# Altium PCB CarnLog-26.PcbDoc (part 4 of 4)
Units mm, origin at the board's own origin, x right, y up, seen from the top; angles counter-clockwise.
Board outline 109.83 x 61.93 mm, 6 copper layers (Sig/Pwr/Gnd-1, Gnd-2, Sig/Pwr/Gnd-3, Sig/Pwr/Gnd-4, Gnd-5, Sig/Pwr-6), stack 1.491 mm thick; 183 components, 128 nets, 802 pads, 490 vias.
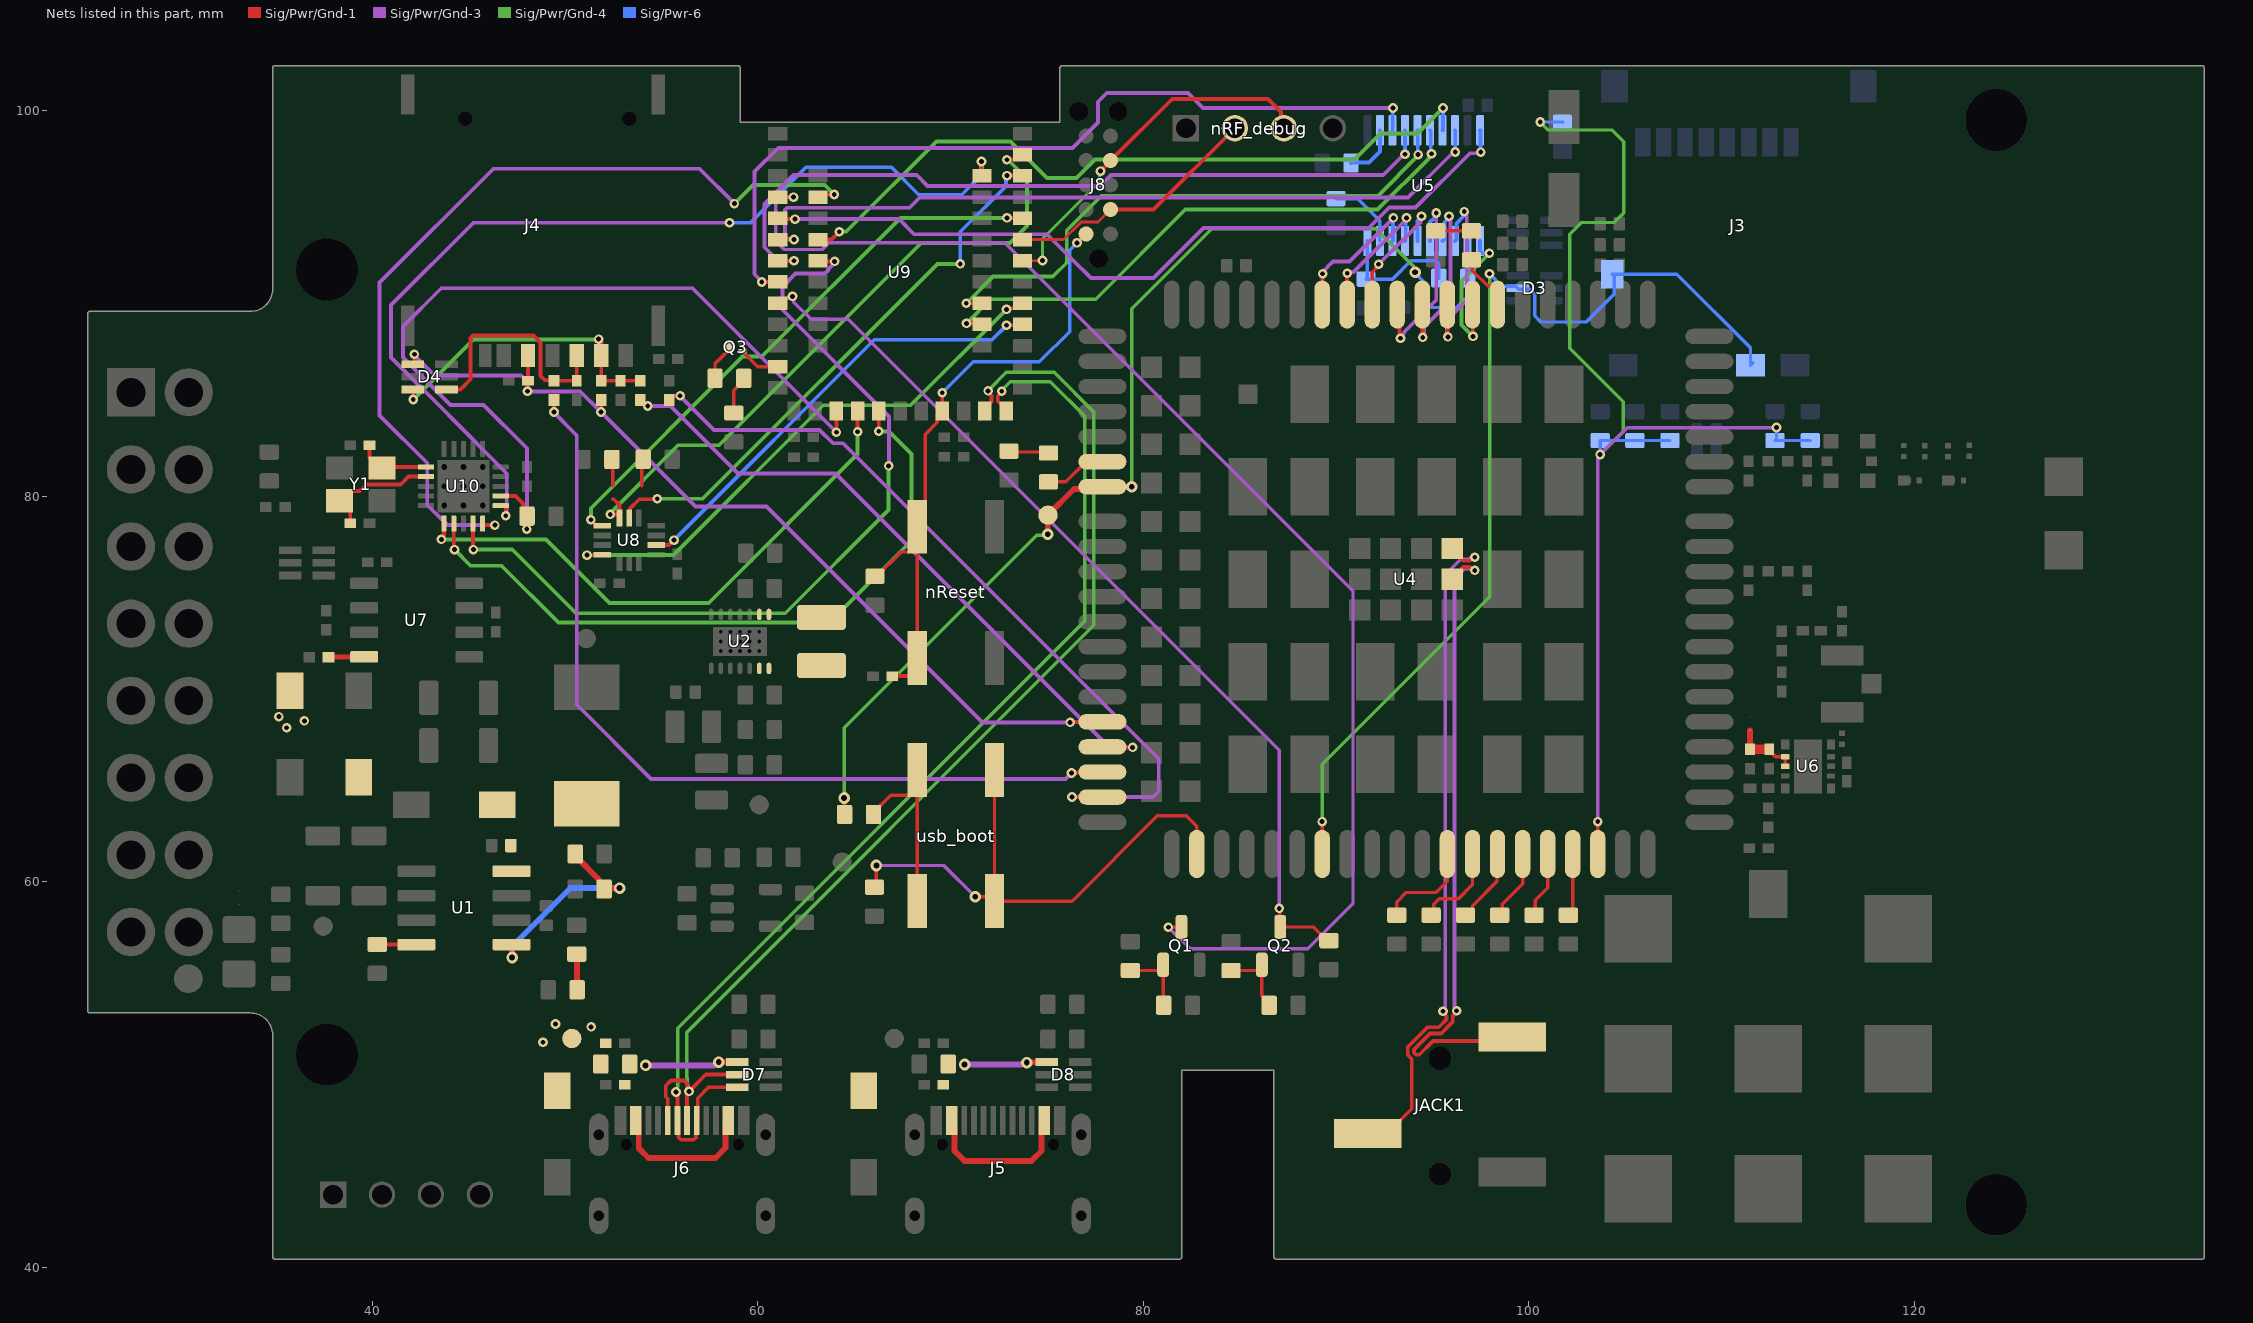
[diagram p7: the nets of this part, all layers, seen from the top]

## Via types
v1: diameter 0.5, hole 0.25, Sig/Pwr/Gnd-1 to Sig/Pwr-6, tented both sides, 370 vias
v2: diameter 0.8, hole 0.5, Sig/Pwr/Gnd-1 to Sig/Pwr-6, tented both sides, 64 vias
v3: diameter 0.6, hole 0.3, Sig/Pwr/Gnd-1 to Sig/Pwr-6, tented both sides, 46 vias
v4: diameter 0.5, hole 0.2, Sig/Pwr/Gnd-1 to Sig/Pwr-6, tented both sides, 10 vias

## Nets (pads, with @x,y where several pads share a name; then routed paths per layer and width w, separated by ;. In a path a pad name is that pad's centre, name@x,y a point inside that pad or via, vN(x,y) a via of type N, cw(c..) or ccw(c..) an arc to the next point about the centre after c; other vN are vias at no path point) (continued)
INT1: U8.4 U9.29 | length 28.8
  Sig/Pwr/Gnd-1 w0.2: v1(51.137,76.954) 51.158,76.975 U8.4@51.925,76.975 ; v1(72.9,89.7) 72.957,89.757 73.209,89.757 73.226,89.775 73.475,89.775 U9.29@73.725,90.025
  Sig/Pwr/Gnd-4 w0.2: v1(51.137,76.954) 55.62,76.954 63.391,84.725 67.925,84.725 v1(72.9,89.7)
INT2: U8.9 U9.28 | length 23.7
  Sig/Pwr/Gnd-1 w0.2: U8.9@54.725,77.475 55.39,77.475 v1(55.646,77.73) ; v1(72.9,88.875) 73.675,88.875 U9.28@73.725,88.925
  Sig/Pwr-6 w0.2: v1(55.646,77.73) 66.041,88.125 72.15,88.125 v1(72.9,88.875)
IO: C50.2 D4.3 J4.C7 R38.1 R41.1 | length 15.7
  Sig/Pwr/Gnd-1 w0.2: D4.3@42.105,85.55 42.125,85.53 v1(42.125,85.025) ; v1(51.738,88.158) 51.885,88.01 J4.C7@51.885,87.3 51.875,87.29 R38.1@51.875,86 C50.2@52.875,86 R41.1@53.9,86
  Sig/Pwr/Gnd-4 w0.2: v1(42.125,85.025) 45.243,88.143 51.723,88.143 v1(51.738,88.158)
L1: L2.1 U2.8 U2.9
L2: L2.2 U2.6 U2.7
LOUDSPK_N: JACK1.3 U4.74 | length 34.3
  Sig/Pwr/Gnd-1 w0.194: U4.74@96.025,75.7 96.478,76.153 96.478,76.226 96.592,76.34 96.933,76.34 97.112,76.16 v1(97.195,76.16) ; v1(96.252,53.31) 96.252,53.227 96.046,53.02 96.046,52.724 95.457,52.135 94.868,52.135 94.037,51.304 94.037,51.143 94.151,51.03 94.311,51.03 95.028,51.747 98.947,51.747 JACK1.3@99.15,51.95
  Sig/Pwr/Gnd-3 w0.185: v1(96.252,53.31) 96.252,53.395 96.142,53.505 96.142,75.732 96.667,76.257 96.929,76.257 96.966,76.22 97.135,76.22 v1(97.195,76.16)
LOUDSPK_P: JACK1.2 U4.73 | length 35.4
  Sig/Pwr/Gnd-1 w0.194: JACK1.2@91.65,46.95 92.65,46.95 93.924,48.224 93.924,50.803 93.716,51.01 93.716,51.437 94.735,52.455 95.324,52.455 95.725,52.856 95.725,53.022 95.546,53.201 v1(95.546,53.284) ; U4.73@96.025,77.3 96.478,76.847 96.478,76.774 96.592,76.66 96.933,76.66 97.112,76.84 v1(97.195,76.84)
  Sig/Pwr/Gnd-3 w0.185: v1(95.546,53.284) 95.546,53.369 95.657,53.479 95.657,75.933 96.466,76.743 96.929,76.743 96.966,76.78 97.135,76.78 v1(97.195,76.84)
MAIN_CTS: U4.64 U5.4 | length 10
  Sig/Pwr/Gnd-1 w0.2: U4.64@94.475,89.95 94.487,89.938 94.487,88.262 v1(94.5,88.25)
  Sig/Pwr/Gnd-3 w0.2: v1(94.5,88.25) 94.557,88.307 94.557,88.782 95.937,90.162 95.937,94.266 95.917,94.286 95.917,94.476 v1(95.859,94.533)
  Sig/Pwr-6 w0.2: U5.4@95.525,93.255 95.63,93.36 95.63,94.223 95.859,94.452 v1(95.859,94.533)
MAIN_DCD: U4.63 U5.3 | length 10.4
  Sig/Pwr/Gnd-1 w0.2: U4.63@95.775,89.95 95.787,89.938 95.787,88.287 v1(95.8,88.275)
  Sig/Pwr/Gnd-3 w0.2: v1(95.8,88.275) 95.758,88.317 95.758,89.154 96.778,90.174 96.778,94.566 96.65,94.694 v1(96.65,94.775)
  Sig/Pwr-6 w0.2: U5.3@96.175,93.255 96.249,93.329 96.249,94.165 96.593,94.509 96.593,94.711 v1@96.65,94.769
MAIN_DTR: U4.66 U5.6 | length 7
  Sig/Pwr/Gnd-1 w0.2: U4.66@91.875,89.95 91.875,91.63 92.204,91.959 v1(92.204,92.04)
  Sig/Pwr/Gnd-3 w0.2: v1(92.204,92.04) 94.376,94.212 94.376,94.477 v1(94.434,94.535)
  Sig/Pwr-6 w0.2: U5.6@94.225,93.255 94.225,94.279 94.434,94.488 v1(94.434,94.535)
MAIN_RI: U4.62 U5.1 | length 7.9
  Sig/Pwr/Gnd-1 w0.2: U4.62@97.075,89.95 97.087,89.938 97.087,88.313 v1(97.1,88.3)
  Sig/Pwr/Gnd-4 w0.2: v1(97.1,88.3) 96.5,88.9 96.5,91.16 v1(97.954,92.614)
  Sig/Pwr-6 w0.2: U5.1@97.475,93.255 97.475,92.723 97.58,92.618 97.95,92.618 v1(97.954,92.614)
MAIN_RTS: U4.65 U5.5 | length 10.7
  Sig/Pwr/Gnd-1 w0.2: U4.65@93.175,89.95 93.281,89.844 93.281,88.259 v1(93.339,88.202)
  Sig/Pwr/Gnd-3 w0.2: v1(93.339,88.202) 93.339,88.274 93.534,88.469 93.534,88.534 95.2,90.2 v1(95.2,94.7)
  Sig/Pwr-6 w0.2: U5.5@94.875,93.255 94.875,94.226 95.143,94.494 95.143,94.643 v1(95.2,94.7)
MAIN_RXD: U4.68 U5.8 | length 7.8
  Sig/Pwr/Gnd-1 w0.2: U4.68@89.275,89.95 89.287,89.962 89.287,91.538 v1(89.3,91.55)
  Sig/Pwr/Gnd-3 w0.2: v1(89.3,91.55) 89.3,91.631 89.568,91.899 89.568,91.918 89.83,92.18 90.705,92.18 v1(92.974,94.45)
  Sig/Pwr-6 w0.2: U5.8@92.925,93.255 92.95,93.28 92.95,94.425 v1(92.974,94.45)
MAIN_TXD: U4.67 U5.7 | length 7.2
  Sig/Pwr/Gnd-1 w0.2: U4.67@90.575,89.95 v1(90.575,91.575)
  Sig/Pwr/Gnd-3 w0.2: v1(90.575,91.575) 90.632,91.632 90.907,91.632 93.654,94.38 v1(93.654,94.45)
  Sig/Pwr-6 w0.2: U5.7@93.575,93.255 93.615,93.295 93.615,94.41 v1(93.654,94.45)
MCP_CS: U9.47 U10.16 | length 50.3
  Sig/Pwr/Gnd-1 w0.2: U10.16@46.66,79.525 46.89,79.525 46.92,79.495 v1(46.92,78.995) ; v1(71.6,97.375) 71.6,96.65 U9.47@71.625,96.625
  Sig/Pwr/Gnd-3 w0.2: v1(46.92,78.995) 46.975,79.05 46.975,81.196 43.975,84.196 43.975,84.212 40.975,87.212 40.975,89.925 45.246,94.196 v1(58.527,94.196)
  Sig/Pwr-6 w0.2: v1(58.527,94.196) 59.621,94.196 62.5,97.075 66.925,97.075 68.35,95.65 70.575,95.65 71.6,96.675 v1(71.6,97.375)
MCP_INT: U9.17 U10.11 | length 29.3
  Sig/Pwr/Gnd-1 w0.2: v1(43.58,77.77) 43.601,77.79 43.725,77.79 U10.11@43.725,78.59 ; v1(65.175,83.35) U9.17@65.175,84.425
  Sig/Pwr/Gnd-4 w0.2: v1(43.58,77.77) 49.005,77.77 52.3,74.475 57.45,74.475 65.175,82.2 v1(65.175,83.35)
MCP_MISO: U9.39 U10.15 | length 45.5
  Sig/Pwr/Gnd-1 w0.2: U10.15@45.725,78.59 45.725,78.54 45.755,78.51 v1(46.355,78.51) ; U9.39@63.125,95.525 63.263,95.663 v1(63.959,95.663)
  Sig/Pwr/Gnd-3 w0.2: v1(46.355,78.51) 43.892,78.51 42.85,79.551 42.85,81.725 40.37,84.205 40.37,91.095 46.275,97 56.971,97 v1(58.782,95.189)
  Sig/Pwr/Gnd-4 w0.2: v1(58.782,95.189) 59.743,96.15 63.473,96.15 v1(63.959,95.663)
MCP_MOSI: U9.42 U10.14 | length 44.6
  Sig/Pwr/Gnd-1 w0.2: U10.14@45.225,78.59 45.225,77.258 v1(45.243,77.24) ; U9.42@63.125,92.225 63.16,92.19 v1(63.982,92.19)
  Sig/Pwr/Gnd-3 w0.2: v1(63.982,92.19) 63.982,92.108 63.642,91.768 63.642,91.717 63.484,91.559 61.959,91.559 61.27,90.87 61.27,89.68 66.805,84.145 66.805,81.605 v1(66.782,81.582)
  Sig/Pwr/Gnd-4 w0.2: v1(45.243,77.24) 47.26,77.24 50.566,73.934 61.42,73.934 66.782,79.296 v1(66.782,81.582)
MCP_RST: R56.2 U9.16 U10.17 | length 44.4
  Sig/Pwr/Gnd-1 w0.2: U10.17@46.66,80.025 47.421,80.025 47.815,79.631 47.815,79.185 R56.2@48.025,78.975 48.008,78.958 v1(48.008,78.3) ; v1(64.075,83.325) U9.16@64.075,84.425
  Sig/Pwr/Gnd-3 w0.2: v1(48.008,78.3) 48.03,78.322 48.03,82.495 45.775,84.75 44.05,84.75 41.595,87.205 41.595,88.82 43.575,90.8 56.6,90.8 v1(64.075,83.325)
MCP_SCK: U9.18 U10.12 | length 36.1
  Sig/Pwr/Gnd-1 w0.2: U10.12@44.225,78.59 44.225,77.274 v1(44.26,77.24) ; v1(66.275,83.375) U9.18@66.275,84.425
  Sig/Pwr/Gnd-4 w0.2: v1(44.26,77.24) 45.099,76.4 46.7,76.4 49.65,73.45 63.725,73.45 67.975,77.7 67.975,82.2 66.8,83.375 v1(66.275,83.375)
MCU_CTS: U5.17 U9.41 | length 38
  Sig/Pwr/Gnd-1 w0.2: U9.41@63.125,93.325 63.825,93.325 v1(64.225,93.725)
  Sig/Pwr/Gnd-4 w0.2: v1(64.225,93.725) 64.239,93.739 64.589,93.739 69.27,98.42 73.102,98.42 74.997,96.525 76.54,96.525 77.495,97.48 90.955,97.48 92.3,98.825 94.225,98.825 v1(95.55,100.15)
  Sig/Pwr-6 w0.2: U5.17@95.525,98.995 95.537,99.007 95.537,100.137 v1(95.55,100.15)
MCU_DCD: U5.18 U9.6 | length 39.9
  Sig/Pwr/Gnd-1 w0.2: U9.6@61.025,93.325 v1(61.875,93.325)
  Sig/Pwr/Gnd-3 w0.2: v1(61.875,93.325) 61.855,93.345 61.517,93.345 61.4,93.462 61.4,94.859 61.517,94.976 67.876,94.976 68.4,95.5 93.726,95.5 95.952,97.726 95.96,97.726 96.104,97.87 v1(96.185,97.87)
  Sig/Pwr-6 w0.2: U5.18@96.175,98.995 96.18,98.99 96.18,97.875 v1(96.185,97.87)
MCU_DTR: U5.15 U9.53 | length 29.7
  Sig/Pwr/Gnd-1 w0.2: v1(70.815,90.023) 71.623,90.023 U9.53@71.625,90.025
  Sig/Pwr/Gnd-4 w0.2: v1(70.815,90.023) 72.192,91.4 75.3,91.4 76.024,92.124 76.024,93.799 77.816,95.591 92.165,95.591 94.255,97.68 v1(94.255,97.73)
  Sig/Pwr-6 w0.2: U5.15@94.225,98.995 94.24,98.98 94.24,97.745 v1(94.255,97.73)
MCU_PWR: C26.2 Q2.C U9.9 | length 48.1
  Sig/Pwr/Gnd-1 w0.177: U9.9@61.025,90.025 61.287,90.287 61.624,90.287 61.713,90.375 v1(61.8,90.375) ; v1(87.05,58.625) 87.075,58.6 87.075,57.685 Q2.C@87.1,57.66 88.815,57.66 89.525,56.95 C26.2@89.625,56.95
  Sig/Pwr/Gnd-3 w0.177: v1(61.8,90.375) 61.862,90.313 61.862,90.081 62.76,89.183 64.692,89.183 87.05,66.825 v1(87.05,58.625)
MCU_RI: U5.20 U9.5 | length 41.6
  Sig/Pwr/Gnd-1 w0.2: U9.5@61.025,94.425 61.067,94.383 v1(61.93,94.383)
  Sig/Pwr/Gnd-3 w0.2: v1(61.93,94.383) 67.32,94.383 68.104,93.6 75.004,93.6 76.018,92.586 76.328,92.276 77.279,91.325 80.525,91.325 83.12,93.92 91.695,93.92 92.755,94.98 94.129,94.98 96.953,97.803 97.444,97.803 v1(97.501,97.861)
  Sig/Pwr-6 w0.2: U5.20@97.475,98.995 97.488,98.982 97.488,97.874 v1(97.501,97.861)
MCU_RST: Q1.C U9.4 | length 69.5
  Sig/Pwr/Gnd-1 w0.177: U9.4@61.025,95.525 v1(61.85,95.525) ; v1(81.3,57.65) 81.965,57.65 Q1.C@81.975,57.66
  Sig/Pwr/Gnd-3 w0.177: v1(61.85,95.525) 61.281,95.525 60.925,95.169 60.925,93.264 61.383,92.807 63.329,92.807 63.683,93.161 72.814,93.161 90.875,75.1 90.875,58.875 88.525,56.525 82.425,56.525 v1(81.3,57.65)
MCU_RTS: U5.16 U9.54 | length 29.9
  Sig/Pwr/Gnd-1 w0.2: v1(70.823,88.976) 71.574,88.976 U9.54@71.625,88.925
  Sig/Pwr/Gnd-4 w0.2: v1(70.823,88.976) 72.076,90.23 77.53,90.23 82.175,94.875 92.149,94.875 94.785,97.511 94.785,97.529 94.95,97.694 v1(94.95,97.775)
  Sig/Pwr-6 w0.2: U5.16@94.875,98.995 94.913,98.957 94.913,97.812 v1(94.95,97.775)
MCU_RXD: U5.13 U9.8 | length 43.6
  Sig/Pwr/Gnd-1 w0.2: v1(60.2,91.125) U9.8@61.025,91.125
  Sig/Pwr/Gnd-3 w0.2: v1(60.2,91.125) 60.2,91.151 59.824,91.527 59.824,96.849 61.055,98.08 76.33,98.08 77.65,99.4 77.65,100.475 78.1,100.925 82.325,100.925 83.1,100.15 v1(92.95,100.15)
  Sig/Pwr-6 w0.2: U5.13@92.925,98.995 92.937,99.007 92.937,100.137 v1(92.95,100.15)
MCU_TXD: U5.14 U9.7 | length 40.9
  Sig/Pwr/Gnd-1 w0.2: U9.7@61.025,92.225 v1(61.875,92.225)
  Sig/Pwr/Gnd-3 w0.2: v1(61.875,92.225) 61.05,92.225 60.35,92.925 60.35,95.175 61.855,96.68 68.241,96.68 68.809,96.112 77.761,96.112 78.33,96.68 92.448,96.68 93.518,97.75 v1(93.575,97.75)
  Sig/Pwr-6 w0.2: v1(93.575,97.75) U5.14@93.575,98.995
NetC6_1: C6.1 R4.2 | length 1.9
  Sig/Pwr/Gnd-1 w0.3: C6.1@50.6,56.25 50.613,56.237 50.613,54.413 R4.2@50.625,54.4
NetN_STS1_A: N_STS1.A U4.6 | length 3.2
  Sig/Pwr/Gnd-1 w0.177: N_STS1.A@75.075,80.75 75.975,80.75 77.025,81.8 U4.6@77.875,81.8
NetN_STS1_K: N_STS1.K R20.1 | length 2.1
  Sig/Pwr/Gnd-1 w0.177: R20.1@73.025,82.35 73.075,82.3 75.025,82.3 N_STS1.K@75.075,82.25
NetnRF_LED_A: nRF_LED.A R46.1 | length 2
  Sig/Pwr/Gnd-1 w0.177: R46.1@58.75,84.325 58.75,85.494 59.275,86.019 nRF_LED.A@59.275,86.125
NetnRF_LED_K: nRF_LED.K Q3.3 | length 1.9
  Sig/Pwr/Gnd-1 w0.177: nRF_LED.K@57.775,86.125 57.775,86.89 58.373,87.488 58.388,87.488 58.5,87.6 Q3.3@58.5,87.75
NetR10_2: R10.2 usb_boot.1 usb_boot.2 | length 9.7
  Sig/Pwr/Gnd-1 w0.177: R10.2@66,63.5 66,63.6 66.888,64.488 67.863,64.488 usb_boot.2@68.275,64.9 ; usb_boot.1@68.275,59 usb_boot.2@68.275,65.8
NetR14_2: R14.2 STS1.K | length 1.8
  Sig/Pwr/Gnd-1 w0.177: R14.2@95.175,93.775 STS1.K@97.025,93.775
NetR17_1: R17.1 R19.2 U5.10 | length 7
  Sig/Pwr-6 w0.177: U5.10@91.625,93.255 91.625,91.35 R19.2@91.55,91.275 92.925,91.275 93.878,92.228 95.197,92.228 95.325,92.1 R17.1@95.325,91.325
NetR21_1: R21.1 U5.12 | length 2.8
  Sig/Pwr-6 w0.2: R21.1@90.775,97.3 90.8,97.325 91.7,97.325 92.275,97.9 U5.12@92.275,98.995
NetR22_2: R22.2 U5.9 | length 3.8
  Sig/Pwr-6 w0.177: R22.2@90,95.45 91.125,95.45 92.275,94.3 U5.9@92.275,93.255
NetSTS1_A: STS1.A U4.61 | length 3
  Sig/Pwr/Gnd-1 w0.177: STS1.A@97.025,92.275 97.064,92.236 97.064,91.713 97.859,90.919 98.087,90.919 98.375,90.631 U4.61@98.375,89.95
nRESET: C55.2 J8.10 nReset.1 nReset.2 R47.2 U9.21 | length 32.5
  Sig/Pwr/Gnd-1 w0.177: R47.2@66.075,75.85 66.175,75.85 67.438,77.113 67.863,77.113 nReset.2@68.275,77.525 ; nReset.1@68.275,71.625 nReset.2@68.275,77.525 ; v1(69.568,85.375) 69.575,85.368 U9.21@69.575,84.425 69.313,84.163 69.313,83.838 68.687,83.212 68.687,78.837 nReset.2@68.275,78.425 nReset.2@68.275,77.525 ; v1(76.554,93.152) 76.561,93.152 77.024,93.615 J8.10@77.03,93.615
  Sig/Pwr/Gnd-1 w0.2: C55.2@66.975,70.675 67.875,70.675 68.275,71.075 nReset.1@68.275,71.625
  Sig/Pwr-6 w0.177: v1(69.568,85.375) 71.168,86.975 74.6,86.975 76.175,88.55 76.175,92.773 v1(76.554,93.152)
nRF_LED: Q3.1 U9.12 | length 2.2
  Sig/Pwr/Gnd-1 w0.177: Q3.1@59.2,87.525 59.275,87.525 59.312,87.488 59.312,87.413 60,86.725 U9.12@61.025,86.725
nRF_USB_N: D7.5 J6.A7 J6.B7 U9.23 | length 60.1
  Sig/Pwr/Gnd-1 w0.194: J6.B7@55.325,47.625 55.325,48.747 55.223,48.849 55.223,49.423 55.5,49.7 56.175,49.7 56.371,49.504 56.371,49.188 v1(56.429,49.13) ; J6.A7@56.325,47.625 56.325,49.13 v1(56.429,49.13) ; D7.5@58.93,50 57.3,50 v1(56.429,49.13) ; U9.23@71.775,84.425 71.775,84.575 72.124,84.924 72.124,85.216 71.945,85.395 v1(71.945,85.475)
  Sig/Pwr/Gnd-4 w0.185: v1(56.429,49.13) 56.369,49.19 56.369,49.359 56.332,49.396 56.332,49.845 56.321,49.857 56.321,52.203 77.435,73.317 77.435,84.376 75.376,86.435 72.887,86.435 71.945,85.493 v1(71.945,85.475)
nRF_USB_P: D7.6 J6.A6 J6.B6 U9.24 | length 58.3
  Sig/Pwr/Gnd-1 w0.194: v1(55.75,49.1) 55.825,49.1 J6.A6@55.825,47.625 55.878,47.572 55.878,46.747 56,46.625 56.674,46.625 56.788,46.739 56.788,47.588 56.878,47.678 56.878,48.778 57.45,49.35 D7.6@58.93,49.35 ; v1(72.649,85.458) 72.649,85.396 72.445,85.192 72.445,84.942 72.559,84.828 72.622,84.828 72.875,84.575 U9.24@72.875,84.425
  Sig/Pwr/Gnd-4 w0.185: v1(55.75,49.1) 55.81,49.16 55.81,49.329 55.847,49.366 55.847,49.644 55.835,49.656 55.835,52.404 76.95,73.518 76.95,84.175 75.175,85.95 73.088,85.95 72.649,85.511 v1(72.649,85.458)
nRF_VUSB: C53.1 D9.K D10.A FB1.1 TP10.1
  other v1: 48.85,51.675 51.35,52.475 49.5,52.625 35.55,68 36.475,68.35 35.15,68.575
OSC1: C60.2 U10.6 Y1.1 | length 3.8
  Sig/Pwr/Gnd-1 w0.2: C60.2@39.85,82.65 39.85,82.025 40.4,81.475 Y1.1@40.5,81.475 40.55,81.525 U10.6@42.79,81.525
OSC2: C62.2 U10.7 Y1.3 | length 6.4
  Sig/Pwr/Gnd-1 w0.2: C62.2@38.85,78.6 38.85,79.275 38.35,79.775 Y1.3@38.3,79.775 38.8,80.275 39.346,80.275 39.696,80.625 41.475,80.625 41.88,81.03 42.785,81.03 U10.7@42.79,81.025
PH: C1.1 D1.K L1.1 U1.8
PK_BS: Q2.B R15.2 R16.2 | length 4
  Sig/Pwr/Gnd-1 w0.177: R15.2@84.55,55.4 85.938,55.4 86.15,55.612 Q2.B@86.15,55.7 86.15,54.081 86.525,53.706 R16.2@86.525,53.6
RST: C48.2 D4.4 J4.C2 R39.2 | length 12.5
  Sig/Pwr/Gnd-1 w0.2: D4.4@43.845,85.55 44.575,85.55 45.1,86.075 45.1,88.233 45.217,88.35 48.354,88.35 48.72,87.984 48.72,86.255 48.95,86.025 49.4,86.025 R39.2@49.425,86 C48.2@50.6,86 50.6,87.285 J4.C2@50.615,87.3
RST_BS: Q1.B R12.2 R13.2 | length 4
  Sig/Pwr/Gnd-1 w0.177: R12.2@79.325,55.4 80.813,55.4 81.025,55.612 Q1.B@81.025,55.7 81.025,53.625 R13.2@81.05,53.6
S: R48.1 U7.8 | length 1.6
  Sig/Pwr/Gnd-1 w0.25: R48.1@37.975,71.65 37.998,71.673 U7.8@39.575,71.673
SCL: SB3.2 U8.13 U9.35 | length 29.3
  Sig/Pwr/Gnd-1 w0.2: U8.13@53.325,78.875 53.375,78.925 53.375,79.379 53.846,79.85 SB3.2@53.975,79.85 54.751,79.85 v1(54.78,79.879) ; v1(72.925,96.642) 73.708,96.642 U9.35@73.725,96.625
  Sig/Pwr/Gnd-4 w0.2: v1(54.78,79.879) 57.129,79.879 69.314,92.064 v1(70.502,92.064)
  Sig/Pwr-6 w0.2: v1(70.502,92.064) 70.502,93.727 72.868,96.093 72.868,96.584 v1(72.925,96.642)
SCL_: R55.1 SB4.1 | length 1.4
  Sig/Pwr/Gnd-1 w0.2: R55.1@52.425,81.919 52.475,81.869 SB4.1@52.475,80.55
SD_CLK: R36.1 U4.32 | length 3.5
  Sig/Pwr/Gnd-1 w0.177: R36.1@100.271,58.275 100.325,58.329 100.325,59.05 100.975,59.7 U4.32@100.975,61.45
SD_CMD: R37.1 U4.33 | length 3.3
  Sig/Pwr/Gnd-1 w0.177: R37.1@102.051,58.275 102.275,58.499 U4.33@102.275,61.45
SD_DAT0: R35.1 U4.31 | length 3.7
  Sig/Pwr/Gnd-1 w0.177: R35.1@98.49,58.275 98.612,58.396 98.612,58.837 99.675,59.9 U4.31@99.675,61.45
SD_DAT1: R34.1 U4.30 | length 3.9
  Sig/Pwr/Gnd-1 w0.177: R34.1@96.71,58.275 96.768,58.275 97.078,58.586 97.078,58.77 98.348,60.04 98.348,61.423 U4.30@98.375,61.45
SD_DAT2: R33.1 U4.29 | length 4.6
  Sig/Pwr/Gnd-1 w0.177: R33.1@94.93,58.275 95.062,58.406 95.062,58.837 95.35,59.125 96.35,59.125 97.075,59.85 U4.29@97.075,61.45
SD_DAT3: R32.1 U4.28 | length 5.2
  Sig/Pwr/Gnd-1 w0.177: R32.1@93.15,58.275 93.15,58.95 93.65,59.45 95.2,59.45 95.775,60.025 U4.28@95.775,61.45
SD_DET: D3.5 J3.9 J3.10 U4.23 | length 53.4
  Sig/Pwr/Gnd-1 w0.177: U4.23@89.275,61.45 v1(89.275,63.125)
  Sig/Pwr/Gnd-4 w0.177: v1(89.275,63.125) 89.275,66.1 97.972,74.797 97.972,91.538 v1(97.962,91.549)
  Sig/Pwr-6 w0.177: v1(97.962,91.549) 97.962,91.537 98.587,90.912 99.313,90.912 D3.5@99.425,90.8 99.475,90.75 100.05,90.75 100.3,90.5 100.3,89.375 100.627,89.048 102.973,89.048 104.425,90.5 104.425,91.425 J3.9@104.325,91.525 107.675,91.525 111.5,87.7 J3.10@111.5,86.8 J3.10@111.625,86.925
SD_VDD: R26.2 R27.2 R28.2 R29.2 R30.2 R31.2 U4.34 | length 63.3
  Sig/Pwr/Gnd-1 w0.177: U4.34@103.575,61.45 v1(103.575,63.125)
  Sig/Pwr/Gnd-3 w0.177: v1(103.575,63.125) 103.575,81.963 103.7,82.088 v1(103.7,82.175) 105.095,83.57 v1(112.85,83.57)
  Sig/Pwr/Gnd-4 w0.177: v1(100.595,99.425) 101.013,99.007 104.318,99.007 104.927,98.398 104.927,94.702 104.436,94.211 102.736,94.211 102.117,93.592 102.117,87.683 104.9,84.9 104.9,83.375 v1(103.7,82.175)
  Sig/Pwr-6 w0.177: v1(100.595,99.425) 101.725,99.425 R26.2@101.75,99.4 ; v1(103.7,82.175) R27.2@103.7,82.9 R29.2@105.5,82.9 R28.2@107.325,82.9 ; v1(112.85,83.57) 112.85,82.975 R31.2@112.775,82.9 R30.2@114.6,82.9
SDA: SB4.2 U8.14 U9.36 | length 34.5
  Sig/Pwr/Gnd-1 w0.2: v1(52.346,79.064) 52.775,79.064 52.825,79.014 U8.14@52.825,78.875 52.825,79.55 52.525,79.85 SB4.2@52.475,79.85 ; v1(72.919,97.464) 72.93,97.475 73.475,97.475 U9.36@73.725,97.725
  Sig/Pwr/Gnd-4 w0.2: v1(52.346,79.064) 52.346,79.145 55.85,82.65 57.975,82.65 68.475,93.15 73.08,93.15 73.965,94.035 73.965,96.48 72.981,97.464 v1(72.919,97.464)
SDA_: R54.1 SB3.1 | length 1.4
  Sig/Pwr/Gnd-1 w0.2: SB3.1@53.975,80.55 53.975,81.85 R54.1@54.05,81.925
SDO/SAO: U8.1 U9.33 | length 30
  Sig/Pwr/Gnd-1 w0.2: v1(51.335,78.785) 51.335,78.765 51.625,78.475 U8.1@51.925,78.475 ; v1(72.925,94.45) 73.7,94.45 U9.33@73.725,94.425
  Sig/Pwr/Gnd-4 w0.2: v1(51.335,78.785) 51.335,79.385 59.2,87.25 60.2,87.25 67.4,94.45 v1(72.925,94.45)
SENSE: R2.1 R5.2 U1.5 | length 11.4
  Sig/Pwr/Gnd-1 w0.3: U1.5@47.22,56.745 47.25,56.715 v3(47.25,56.075) ; R2.1@50.525,61.45 50.525,61.35 51.775,60.1 51.775,59.875 R5.2@52.025,59.625 52.05,59.65 52.8,59.65 v3(52.825,59.675)
  Sig/Pwr-6 w0.3: v3(47.25,56.075) 47.25,56.65 50.275,59.675 v3(52.825,59.675)
SS: C8.2 U1.4 | length 2
  Sig/Pwr/Gnd-1 w0.2: C8.2@40.25,56.75 40.255,56.745 U1.4@42.28,56.745
  Sig/Pwr/Gnd-1 w0.3: U1.4@42.28,56.745 U1.4@42.28,56.75
SWDCLK: J8.4 nRF_debug.03 U9.31 | length 19.1
  Sig/Pwr/Gnd-1 w0.15: U9.31@73.725,92.225 74.757,92.225 v1(74.769,92.237)
  Sig/Pwr/Gnd-1 w0.2: v1(77.775,96.875) 77.775,96.888 78.3,97.413 J8.4@78.3,97.425 81.5,100.625 86.475,100.625 87.149,99.951 87.149,99.241 nRF_debug.03@87.29,99.1
  Sig/Pwr/Gnd-4 w0.15: v1(74.769,92.237) 74.769,93.369 77.725,96.325 77.725,96.825 v1(77.775,96.875)
SWDIO: J8.2 nRF_debug.02 U9.32 | length 13.4
  Sig/Pwr/Gnd-1 w0.15: U9.32@73.725,93.325 75.865,93.325 76.774,94.234 77.649,94.234 J8.2@78.3,94.885
  Sig/Pwr/Gnd-1 w0.2: J8.2@78.3,94.885 80.535,94.885 nRF_debug.02@84.75,99.1
USB_BOOT: R11.2 U4.115 usb_boot.3 usb_boot.4 | length 28.8
  Sig/Pwr/Gnd-1 w0.177: R11.2@66.05,59.725 66.15,59.825 v3(66.15,60.85) ; v3(71.275,59.225) 72.05,59.225 usb_boot.3@72.275,59 ; usb_boot.4@72.275,65.8 usb_boot.3@72.275,59 ; U4.115@82.775,61.45 82.775,62.875 82.226,63.424 80.724,63.424 76.3,59 usb_boot.3@72.275,59
  Sig/Pwr/Gnd-3 w0.177: v3(66.15,60.85) 69.65,60.85 v3(71.275,59.225)
USIM_CLK: R39.1 U4.16 | length 45.3
  Sig/Pwr/Gnd-1 w0.2: v1@49.424,84.378 R39.1@49.424,84.999 ; v1(76.275,65.65) 76.3,65.675 77.85,65.675 U4.16@77.875,65.7
  Sig/Pwr/Gnd-3 w0.2: v1(49.424,84.377) 49.424,84.35 50.607,83.167 50.607,69.193 54.455,65.345 75.97,65.345 v1(76.275,65.65)
USIM_DATA: R41.2 U4.15 | length 34.6
  Sig/Pwr/Gnd-1 w0.2: R41.2@53.9,85 53.9,84.975 54.126,84.749 54.225,84.749 v1(54.283,84.692) ; U4.15@77.875,67 77.888,66.988 79.433,66.988 v1(79.445,66.975)
  Sig/Pwr/Gnd-3 w0.2: v1(54.283,84.692) 55.47,84.692 58.972,81.19 64.035,81.19 78.25,66.975 v1(79.445,66.975)
USIM_RST: R40.1 U4.17 | length 41.2
  Sig/Pwr/Gnd-1 w0.2: R40.1@55.4,85 55.4,85.025 55.575,85.2 55.95,85.2 v1(55.967,85.216) ; v1(76.3,64.4) U4.17@77.875,64.4
  Sig/Pwr/Gnd-3 w0.2: v1(55.967,85.216) 57.733,83.45 63.2,83.45 63.895,82.755 64.415,82.755 80.8,66.37 80.8,64.7 80.5,64.4 v1@76.317,64.4
USIM_VDD: C49.2 D4.1 J4.C1 R38.2 U4.14 | length 47
  Sig/Pwr/Gnd-1 w0.2: D4.1@42.105,86.85 42.18,86.925 v1(42.18,87.37) ; v1(48.05,85.45) 48.05,85.975 C49.2@48.075,86 J4.C1@48.075,87.3 ; v1(51.859,84.376) 51.875,84.392 R38.2@51.875,85 ; v1(76.2,68.275) 76.213,68.288 77.863,68.288 U4.14@77.875,68.3
  Sig/Pwr/Gnd-3 w0.2: v1(42.18,87.37) 42.18,87.315 43.22,86.275 47.725,86.275 48.05,85.95 v1(48.05,85.45) 50.785,85.45 v1(51.859,84.376) ; v1@51.861,84.376 56.762,79.475 60.45,79.475 71.65,68.275 v1(76.2,68.275)
VBUS_EC: C51.1 D6.K D8.4 FB2.2 J5.A4B9 J5.B4A9 | length 12.2
  Sig/Pwr/Gnd-1 w0.3: J5.A4B9@70.059,47.444 70.209,47.294 70.209,46.041 70.725,45.525 74.2,45.525 74.709,46.034 74.709,47.294 J5.B4A9@74.859,47.444 ; v3(73.95,50.625) 73.963,50.638 74.967,50.638 D8.4@74.98,50.65
  Sig/Pwr/Gnd-3 w0.3: v3(70.725,50.525) 73.638,50.525 73.68,50.568 73.893,50.568 v3(73.95,50.625)
VBUS_nRF: C52.1 D5.K D7.4 FB1.2 J6.A4B9 J6.B4A9 | length 12.8
  Sig/Pwr/Gnd-1 w0.3: J6.A4B9@53.675,47.625 53.825,47.475 53.825,46.175 54.326,45.674 57.799,45.674 58.325,46.2 58.325,47.475 J6.B4A9@58.475,47.625 ; v3(57.975,50.65) D7.4@58.93,50.65
  Sig/Pwr/Gnd-3 w0.3: v3(54.175,50.475) 57.719,50.475 57.894,50.65 v3(57.975,50.65)
VCC_LNA: C41.2 C42.2 SB1.2 U6.2 U6.3 | length 3.5
  Sig/Pwr/Gnd-1 w0.2: C41.2@112.475,66.875 112.475,66.825 112.807,66.493 U6.2@113.3,66.493 U6.3@113.3,65.994
  Sig/Pwr/Gnd-1 w0.3: C42.2@111.475,66.875 SB1.2@111.475,67.85
  Sig/Pwr/Gnd-1 w0.5: C42.2@111.475,66.875 C41.2@112.475,66.875
VDD_EXT: C27.1 R10.1 R17.2 TP9.1 U4.7 U5.2 | length 59.3
  Sig/Pwr/Gnd-1 w0.177: v3(64.475,64.35) 64.475,63.525 R10.1@64.5,63.5
  Sig/Pwr/Gnd-1 w0.3: v3(75.036,78.036) 75.043,78.043 75.043,79.018 76.406,80.381 77.756,80.381 U4.7@77.875,80.5 v3(79.395,80.5)
  Sig/Pwr/Gnd-4 w0.177: v3(64.475,64.35) 64.475,67.998 74.47,77.994 74.994,77.994 v3(75.036,78.036) ; v3(79.395,80.5) 79.395,89.745 83.543,93.893 92.053,93.893 94.019,91.928 94.019,91.706 v3(94.1,91.625)
  Sig/Pwr-6 w0.177: v3(94.1,91.625) 94.1,91.59 94.544,91.145 94.544,90.531 94.55,90.526 C27.1@94.55,89.8 96.25,89.8 96.825,90.375 R17.2@96.825,91.325 U5.2@96.825,93.255
pads on no net: D3.1 D3.3 D3.4 D4.6 D11.1 D11.3 D11.6 J3.P$1 J3.P$2 J3.P$3 J3.P$5 J4. J4.C6 J4.CD J5.A8 J5.B8 J5.MH J6.A8 J6.B8 J6.MH J7.1 J7.2 J7.3 J7.7 J7.8 J7.9 J7.10 J7.11 J7.12 J7.13 J7.15 J8.0 J8.6 J8.7 J8.8 J8.9 JACK1. U2.14 U3.4 U4.1 U4.2 U4.3 U4.4 U4.5 U4.13 U4.18 U4.24 U4.25 U4.26 U4.27 U4.35 U4.37 U4.38 U4.39 U4.40 U4.41 U4.42 U4.43 U4.44 U4.45 U4.55 U4.75 U4.76 U4.77 U4.78 U4.79 U4.80 U4.81 U4.82 U4.83 U4.84 U4.85 U4.86 U4.87 U4.88 U4.89 U4.90 U4.91 U4.92 U4.93 U4.94 U4.95 U4.96 U4.97 U4.98 U4.99 U4.100 U4.101 U4.102 U4.103 U4.104 U4.105 U4.106 U4.107 U4.108 U4.109 U4.110 U4.111 U4.112 U4.113 U4.114 U4.116 U4.117 U4.118 U4.119 U4.120 U4.121 U4.122 U4.123 U4.124 U4.125 U4.126 U4.127 U4.128 U4.129 U4.130 U4.131 U4.132 U4.133 U4.134 U4.135 U4.136 U4.137 U4.138 U4.139 U4.140 U4.141 U4.142 U4.143 U4.144 U6. U8.10 U8.11 U9.2 U9.3 U9.10 U9.11 U9.13 U9.15 U9.19 U9.20 U9.26 U9.27 U9.30 U9.34 U9.38 U9.40 U9.43 U9.45 U9.46 U9.48 U9.49 U9.50 U9.51 U9.52 U9.55 U10.1 U10.2 U10.3 U10.4 U10.5 U10.9 U10.10 U10.13
copper on no net:
  other v1: 125.25,59.425 133.3,95.975

## Polygon pours and split planes (outlines as drawn)
GND on Sig/Pwr/Gnd-1 "NONET_L-01_P-001" (solid, remove dead copper, pour order 37): 134.95,102.225 134.95,40.549 86.925,40.549 86.925,50.35 81.9,50.35 81.9,40.549 34.975,40.549 34.975,52.055 ccw(c33.705,52.055) 33.705,53.325 25.375,53.325 25.375,89.475 33.705,89.475 ccw(c33.705,90.745) 34.975,90.745 34.975,102.225 58.975,102.225 58.975,99.275 75.825,99.275 75.825,102.225
nRF_VUSB on Sig/Pwr/Gnd-1 "NONET_L-01_P-001" (solid, pour order 30): 36.779,67.275 37.5,67.275 37.5,64 40.55,64 40.55,66.675 37.975,66.675 37.975,71.15 36.775,71.15 36.775,67.275
EC_VUSB on Sig/Pwr/Gnd-1 "NONET_L-01_P-001" (solid, pour order 21): 38.325,71.125 40.475,71.125 40.475,66.95 38.325,66.95
nRF_VUSB on Sig/Pwr/Gnd-1 "NONET_L-01_P-001" (solid, pour order 20): 37.067,67.256 37.067,71.15 34,71.15 34,67.255 37.062,67.255
VBUS_nRF on Sig/Pwr/Gnd-1 "VBUS_NRF_L01_P000" (solid, remove dead copper, pour order 0): 53.975,46.875 53.375,46.875 53.375,48.575 50.375,48.575 50.375,47.25 48.362,47.25 48.362,50.275 50.9,50.275 50.9,48.925 52.75,48.925 52.75,51.2 54.625,51.2 54.625,48.825 53.975,48.825
VBUS_EC on Sig/Pwr/Gnd-1 "VBUS_EC_L01_P001" (solid, pour order 1): 69.775,48.375 69.775,46.875 70.35,46.875 70.35,49.2 71.075,49.2 71.075,51.24 69.075,51.24 69.075,48.85 66.8,48.85 66.8,50.675 64.25,50.675 64.25,46.925 66.825,46.925 66.825,48.375 69.75,48.375
EC_VUSB on Sig/Pwr/Gnd-1 "EC_VUSB_L01_P036" (solid, remove dead copper, pour order 36): 68.9,49.975 68.9,51.24 69.125,51.24 69.125,54.45 63.775,54.45 63.775,50.775 67.825,50.775 67.825,49.975
nRF_VUSB on Sig/Pwr/Gnd-1 "NRF_VUSB_L01_P034" (solid, remove dead copper, pour order 34): 52.55,53.15 47.6,53.15 47.6,50.4 51.275,50.4 51.275,49.85 52.55,49.85
GND on Sig/Pwr/Gnd-1 "NONET_L-01_P-001" (solid, pour order 19): 44.3,70.9 44.3,61.4 45.375,61.4 45.375,59.725 49.75,59.725 49.75,60.4 51.025,60.4 51.025,58.3 48.4,58.3 48.4,58.425 45.975,58.425 45.975,55.625 49.95,55.625 49.95,53.45 35.475,53.45 35.475,53.875 31.85,53.875 31.85,56.325 34.275,56.325 34.275,55.5 39.525,55.5 39.525,56.125 43.55,56.125 43.55,61.575 36.1,61.575 36.1,63.425 40.925,63.425 40.925,70.9
+4V on Sig/Pwr/Gnd-1 "NONET_L-01_P-001" (solid, pour order 4): 45.1,70.925 49.1,70.925 49.1,73.95 55.575,73.95 55.575,75.85 58.175,75.85 58.175,78.25 60.068,78.25 60.068,74.4 56.025,74.4 56.025,72.075 53.325,72.075 53.325,66.85 55.125,66.85 55.125,62.275 57.85,62.275 57.85,60.225 58.959,60.225 58.959,59.175 57.275,59.175 57.275,58.7 55,58.7 55,60.836 51.35,60.836 51.35,62.175 53.925,62.175 53.925,66.024 45.1,66.024
+VIN on Sig/Pwr/Gnd-1 "NONET_L-01_P-001" (solid, pour order 2): 43.475,60.05 43.475,58.6 38.45,58.6 38.45,56.75 36.4,56.75 36.4,58.675 34,58.675 34,67.1 37.05,67.1 37.05,63.675 35.825,63.675 35.825,60.875 40.8,60.875 40.8,60.05 41.075,60.05
+4V on Sig/Pwr/Gnd-1 "NONET_L-01_P-001" (solid, pour order 32): 99.225,94.7 99.225,87.35 102.825,87.35 102.825,88.5 104.2,88.5 104.2,94.625 102.875,94.625 102.875,96.9 100.775,96.9 100.775,94.7
GND on Sig/Pwr/Gnd-1 "NONET_L-01_P-001" (solid, pour order 31): 53.5,71.975 56.425,71.975 56.425,71.522 56.175,71.522 56.175,69.1 56.575,69.1 56.575,67.05 53.5,67.05
L2 on Sig/Pwr/Gnd-1 "NONET_L-01_P-001" (solid, pour order 7): 59.85,71.5 61.85,71.5 61.85,72.1 64.8,72.1 64.8,70.35 61.85,70.35 61.85,70.675 59.85,70.675
+3V3 on Sig/Pwr/Gnd-1 "NONET_L-01_P-001" (solid, pour order 18): 59.9,60.35 62.575,60.35 62.575,62.425 65.375,62.425 65.375,58.6 59.9,58.6
GND on Sig/Pwr/Gnd-1 "NONET_L-01_P-001" (solid, pour order 8): 61.653,73.265 61.653,72.74 64.787,72.74 64.787,72.152 61.65,72.152 61.65,71.685 56.325,71.685 56.325,73.265
L1 on Sig/Pwr/Gnd-1 "NONET_L-01_P-001" (solid, pour order 6): 61.8,72.825 61.8,73.475 59.8,73.475 59.8,74.303 61.875,74.303 61.875,74.55 64.8,74.55 64.8,72.825
+5V on Sig/Pwr/Gnd-1 "NONET_L-01_P-001" (solid, pour order 5): 58.4,66.875 58.75,66.875 58.75,64.95 56.275,64.95 56.275,62.625 62.7,62.625 62.7,65 60.075,65 60.075,70.369 58.4,70.369
PH on Sig/Pwr/Gnd-1 "NONET_L-01_P-001" (solid, pour order 3): 45.925,61.075 46.725,61.075 46.725,63 45.35,63 45.35,65.875 53.5,65.875 53.5,62.35 48.625,62.35 48.625,59.975 45.925,59.975
GND on Sig/Pwr/Gnd-3 "NONET_L-01_P-001" (solid, remove dead copper, pour order 23): 134.95,102.225 134.95,40.549 86.925,40.549 86.925,50.35 81.9,50.35 81.9,40.549 34.975,40.549 34.975,52.055 ccw(c33.705,52.055) 33.705,53.325 25.375,53.325 25.375,89.475 33.705,89.475 ccw(c33.705,90.745) 34.975,90.745 34.975,102.225 58.975,102.225 58.975,99.275 75.825,99.275 75.825,102.225
EC_VUSB on Sig/Pwr/Gnd-3 "NONET_L-01_P-001" (solid, pour order 17): 69,51.075 69,54.45 57.65,54.45 57.65,58.475 48.65,58.475 48.65,70.425 38.15,70.425 38.15,66.75 46.85,66.75 46.85,57.075 55.575,57.075 55.575,51.075
nRF_VUSB on Sig/Pwr/Gnd-3 "NONET_L-01_P-001" (solid, pour order 16): 52.175,50.975 52.175,53.25 40.6,53.25 40.6,57.975 37.325,57.975 37.325,70.45 34.675,70.45 34.675,55.325 39.45,55.325 39.45,50.975 52.15,50.975
no net on Board Layer Stack Bottom Overlay "NONET_L-01_P-001" (solid): 90.546,57.425 90.546,42.575 118.515,42.575 118.515,57.425
GND on Gnd-2 "NONET_L-01_P-001" (solid, pour order 22): 134.95,102.225 134.95,40.549 86.925,40.549 86.925,50.35 81.9,50.35 81.9,40.549 34.975,40.549 34.975,52.055 ccw(c33.705,52.055) 33.705,53.325 25.375,53.325 25.375,89.475 33.705,89.475 ccw(c33.705,90.745) 34.975,90.745 34.975,102.225 58.975,102.225 58.975,99.275 75.825,99.275 75.825,102.225
GND on Sig/Pwr/Gnd-4 "NONET_L-01_P-001" (solid, remove dead copper, pour order 24): 134.95,102.225 134.95,40.549 86.925,40.549 86.925,50.35 81.9,50.35 81.9,40.549 34.975,40.549 34.975,52.055 ccw(c33.705,52.055) 33.705,53.325 25.375,53.325 25.375,89.475 33.705,89.475 ccw(c33.705,90.745) 34.975,90.745 34.975,102.225 58.975,102.225 58.975,99.275 75.825,99.275 75.825,102.225
GND on Gnd-5 "NONET_L-01_P-001" (solid, pour order 26): 134.95,102.225 134.95,40.549 86.925,40.549 86.925,50.35 81.9,50.35 81.9,40.549 34.975,40.549 34.975,52.055 ccw(c33.705,52.055) 33.705,53.325 25.375,53.325 25.375,89.475 33.705,89.475 ccw(c33.705,90.745) 34.975,90.745 34.975,102.225 58.975,102.225 58.975,99.275 75.825,99.275 75.825,102.225
+4V on Sig/Pwr-6 "NONET_L-01_P-001" (solid, remove dead copper, pour order 28): 134.95,102.225 134.95,40.549 86.925,40.549 86.925,50.35 81.9,50.35 81.9,40.549 34.975,40.549 34.975,52.055 ccw(c33.705,52.055) 33.705,53.325 25.375,53.325 25.375,89.475 33.705,89.475 ccw(c33.705,90.745) 34.975,90.745 34.975,102.225 58.975,102.225 58.975,99.275 75.825,99.275 75.825,102.225

## Silkscreen, mask and mechanical layers (free items; w line width, h text height)
Top Overlay:
  region: 41,100.375 41,101.187 41.07,101.257 40.893,101.434 36.055,101.434 35.878,101.257 35.878,100.397 35.9,100.375
  region: 41.018,95.143 40.051,94.176 36.055,94.176 35.8,94.431 35.8,95.175
  lines w0.25: 35.878,94.353 ccw(c36.055,94.353) 36.055,94.176 39.978,94.176 ccw(c39.978,94.353) 40.104,94.228 41.018,95.143 ccw(c40.893,95.268) 41.07,95.268 41.07,101.257 ccw(c40.893,101.257) 40.893,101.434 36.055,101.434 ccw(c36.055,101.257) 35.878,101.257 35.878,94.353
  lines w0.254: 68.637,80.504 71.431,80.504 ; 71.177,80.504 70.669,80.758 70.669,80.25 71.431,80.504 ; 71.431,80.504 70.669,81.012 70.669,79.996 71.431,80.504
  lines w0.3: 33.175,76.6 33.175,88.5 ; 33.2,60.2 33.2,62.95 33.2,66.775
  text "BLE" at 56.475,101.875 h1.8 r270
  text "NANO / SIM / CARD" at 35.974,100.555 h1.8 r270
  text "SWD" at 81.525,100.45 h1.8
  text "IO" at 83.85,97.75 h1.8 r270
  text "CLK" at 86.45,97.75 h1.8 r270
  text "GND" at 89.338,97.592 h1.78 r270
  text "CarnLog-26" at 108.925,92.725 h3
  text "STS" at 90.5,92.275 h1.8
  text "NSTS" at 62.987,79.625 h1.8
  text "LTE" at 111.36,77.968 h1.8
  text "OBD II PORT" at 32.25,76.175 h1.8 r270
  text "RESET" at 65.9,67.8 h1.8
  text "GPS" at 114.58,62.4 h1.8
  text "USB BOOT" at 65.863,54.8 h1.8
  text "nRF USBFS" at 62.3,49.775 h1.8 r270
  text "EC USBFS" at 78.625,49.775 h1.8 r270
  text "AUDIO OUT" at 87.6,49.775 h1.8 r270
  text "GND" at 45.113,48.717 h1.78 r270
  text "TXD" at 39.625,48.625 h1.8 r270
  text "RXD" at 42.175,48.625 h1.8 r270
  text "UART DBG" at 37.275,40.7 h1.8
Board Layer Stack Bottom Overlay:
  text "SD CARD" at 120.05,101.775 h1.8 r90
  text "Product of Lab Fermion" at 118.513,57.692 h3
Top Solder:
  lines w0.254: 27.475,85.4 27.525,85.4
Mechanical 1:
  lines w0.254: 35.775,40.549 35.726,40.549 ; 35.726,40.549 81.875,40.549 81.875,50.35 86.9,50.35 86.9,40.549 134.925,40.549 134.925,102.225 134.382,102.225 ; 35.726,40.549 34.95,40.549 34.95,41.325 34.95,46.725 34.95,52.055 ccw(c33.68,52.055) 33.68,53.325 25.35,53.325 25.35,83.25 25.35,89.475 33.68,89.475 ccw(c33.68,90.745) 34.95,90.745 34.95,101.725 34.95,102.225 35.45,102.225 58.95,102.225 58.95,99.275 75.8,99.275 75.8,102.225 134.382,102.225 ; 134.382,102.225 134.382,102.225

## Text inside footprints (layer, text, board x,y; h text height)
A2: Top Assembly "COPPER KEEPOUT" at 114.125,60.475 h0.2 r270
N_STS1: Mechanical 13 "+" at 75.683,80.183 h0.5 r270
nRF_LED: Mechanical 13 "+" at 59.842,86.733 h0.5
STS1: Mechanical 13 "+" at 97.633,91.708 h0.5 r270